# Altium PCB PY32F002AW15S6TU.pcbdoc
Units mil, origin at the board's own origin, x right, y up, seen from the top; angles counter-clockwise.
Board outline 907.9 x 798.3 mil, 2 copper layers (Top Layer, Bottom Layer), stack 0 mil thick; 1 components, 0 nets, 16 pads, 0 vias.
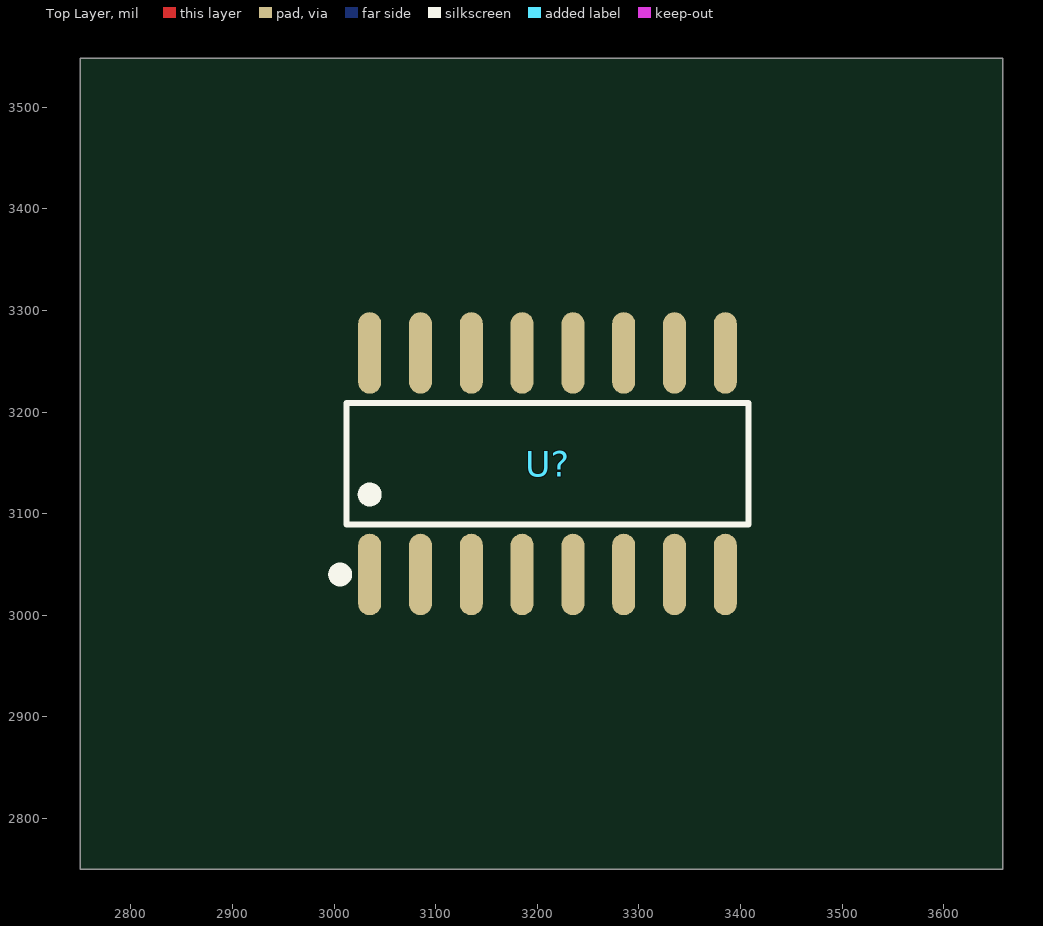
[diagram p0: Top Layer view]
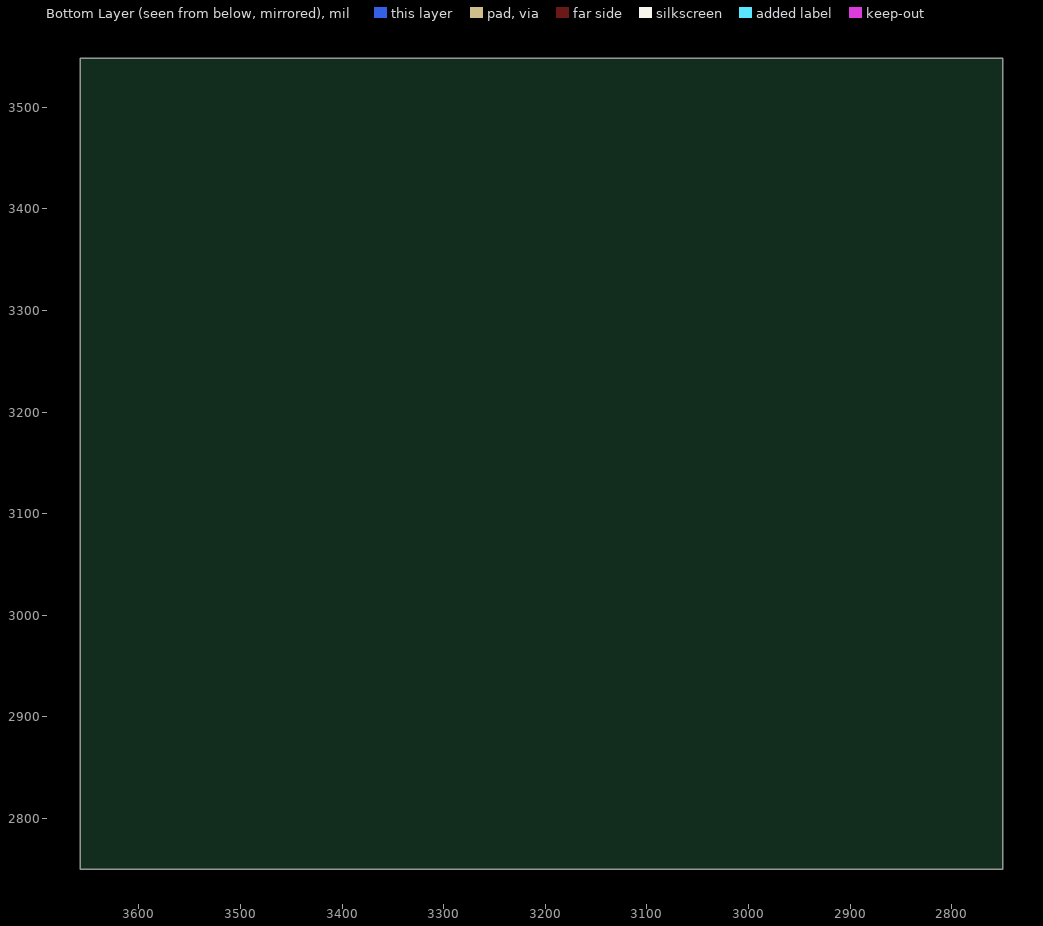
[diagram p1: Bottom Layer view, seen from below]

## Layer stack, top to bottom
Top Layer: signal copper (thickness not stored)
Bottom Layer: signal copper (thickness not stored)

## Board outline
3657.9,2750 2750,2750 2750,3548.3 3657.9,3548.3

## Components (designator, comment, footprint, x,y, rotation, side; value= is the part's Value field where it differs from the comment)
U? "PY32F002AW15S6TU" SOP-16_L9.9-W3.9-P1.27-LS6.0-BL 3210,3149.1 r0 top

## Footprints (in the part's own frame and the unit in brackets; to place one, negate y for a bottom-side part, rotate by r counter-clockwise, add the part's x,y. Pads: shape width x height; smd on the part's side, far side on the other; paste and mask are expansions set on the pad)
SOP-16_L9.9-W3.9-P1.27-LS6.0-BL [mil]
  oval 22.6x80.2 smd: 1(-175,-109) 2(-125,-109) 3(-75,-109) 4(-25,-109) 5(25,-109) 6(75,-109) 7(125,-109) 8(175,-109) 9(175,109.1) 10(125,109.1) 11(75,109.1) 12(25,109.1) 13(-25,109.1) 14(-75,109.1) 15(-125,109.1) 16(-175,109.1)
  silkscreen extent -210,-115 198,60

## Nets (pads, with @x,y where several pads share a name; then routed paths per layer and width w, separated by ;. In a path a pad name is that pad's centre, name@x,y a point inside that pad or via, vN(x,y) a via of type N, cw(c..) or ccw(c..) an arc to the next point about the centre after c; other vN are vias at no path point)
pads on no net: U?.1 U?.2 U?.3 U?.4 U?.5 U?.6 U?.7 U?.8 U?.9 U?.10 U?.11 U?.12 U?.13 U?.14 U?.15 U?.16